# Altium PCB charging_device.PcbDoc (part 1 of 3)
Units mm, origin at the board's own origin, x right, y up, seen from the top; angles counter-clockwise.
Board outline 200.72 x 85.24 mm, 2 copper layers (Top Layer, Bottom Layer); 199 components, 123 nets, 612 pads, 55 vias.
Unrouted connection lines stored in the file: 5.
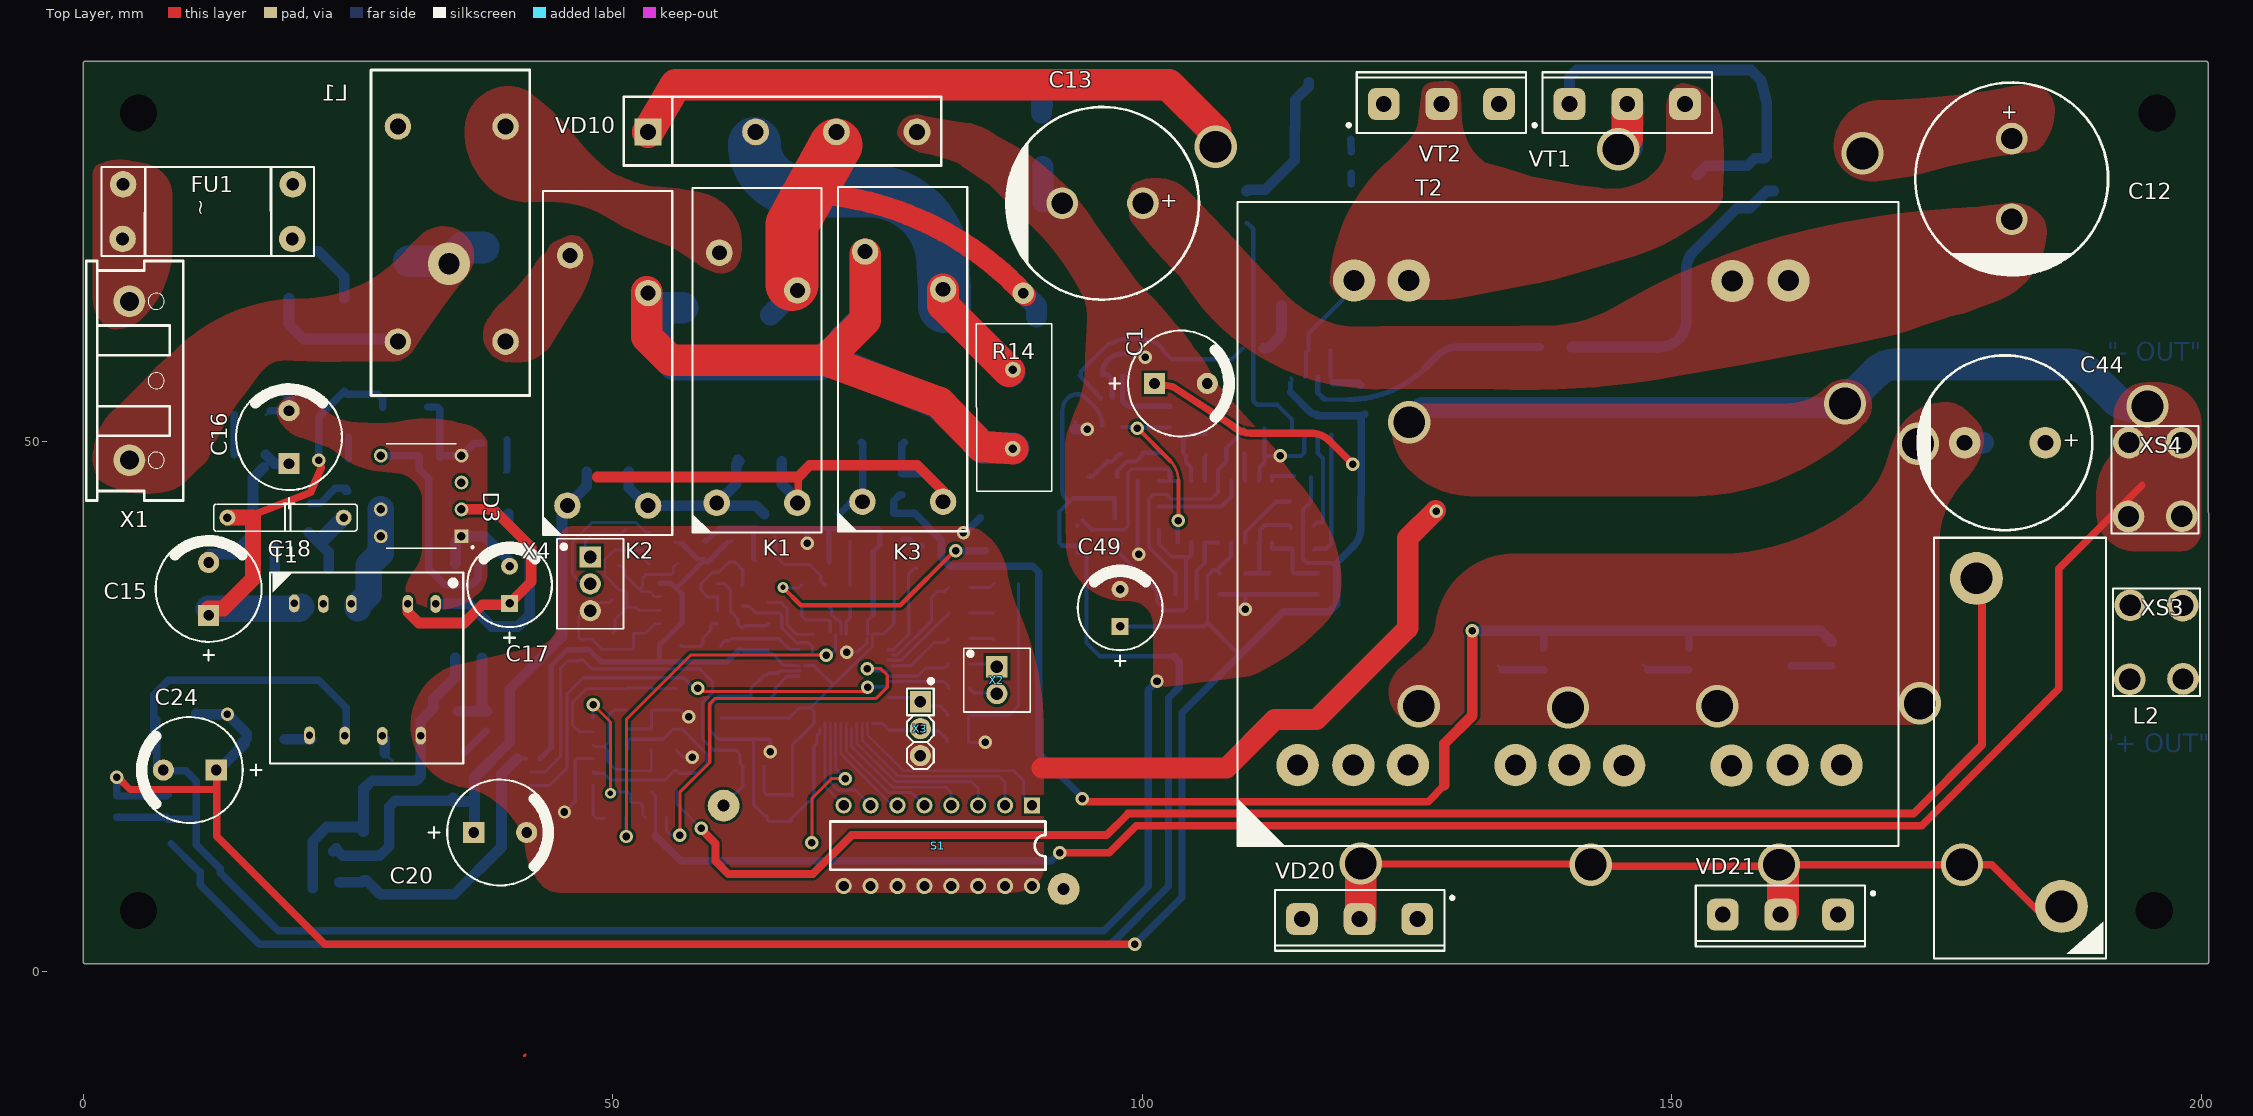
[diagram p0: Top Layer view]
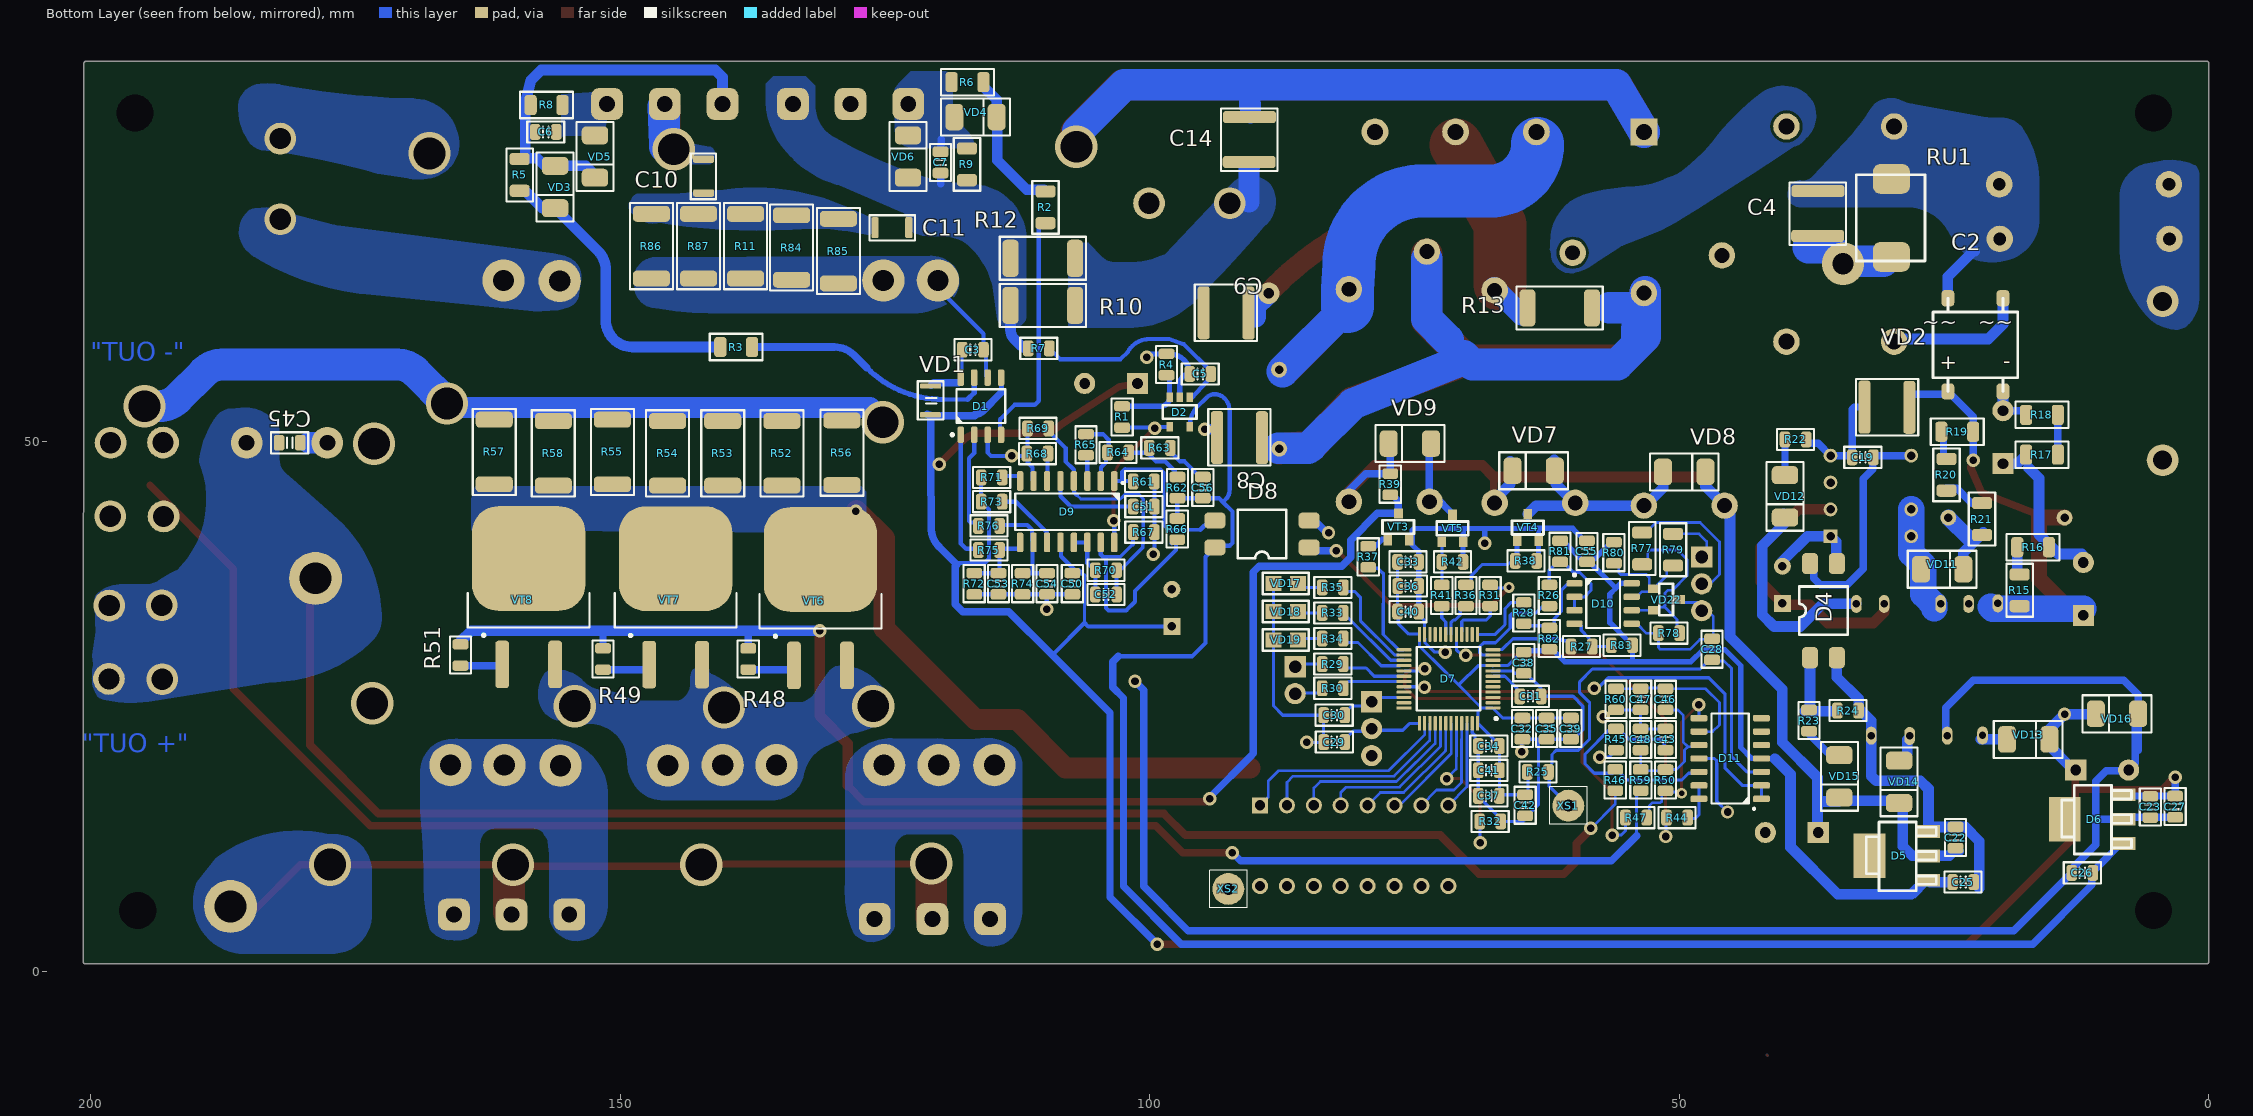
[diagram p1: Bottom Layer view, seen from below]
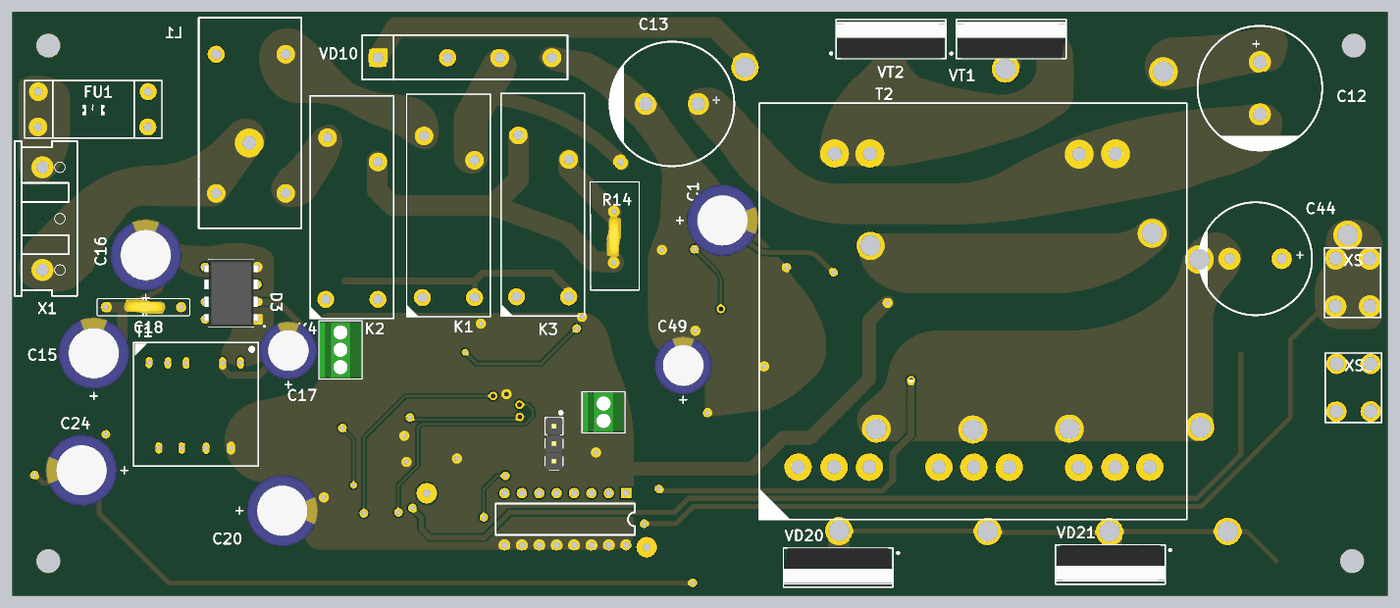
[diagram p4: 3D render of the assembled board from above, using the file's embedded part models]
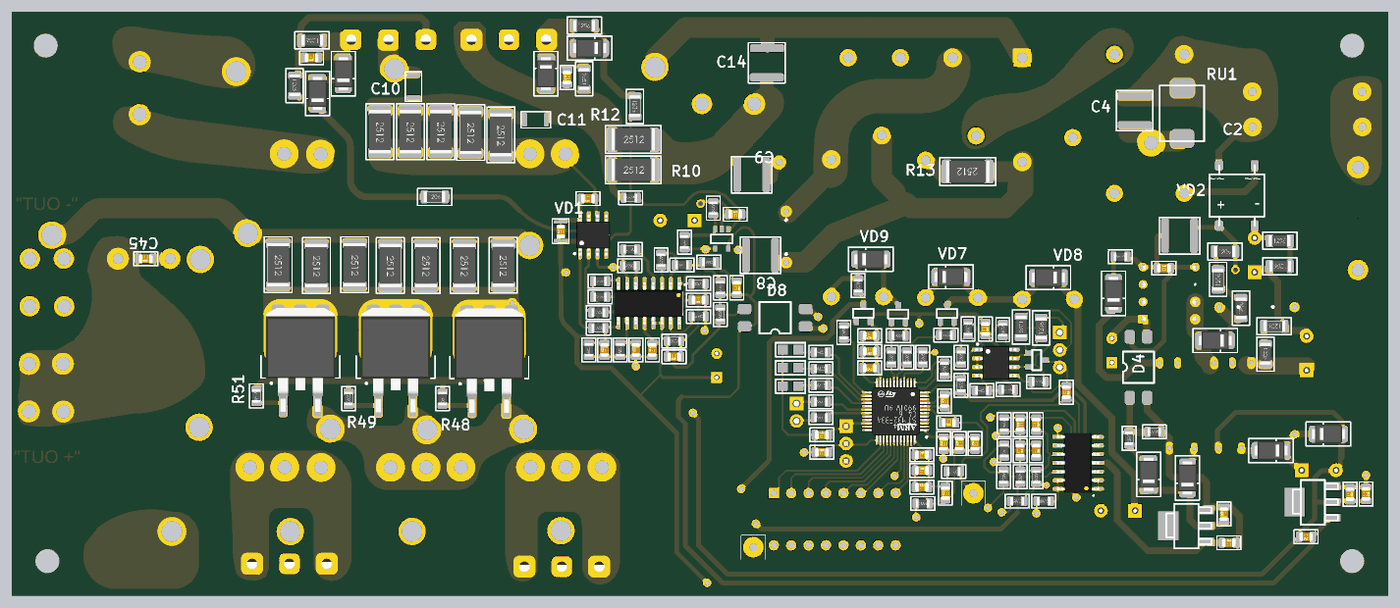
[diagram p5: 3D render of the assembled board from below, using the file's embedded part models]

## Layer stack, top to bottom
Top Solder: solder mask 0.0102, Solder Resist, Dk 3.5
Top Layer: signal copper 0.0356
Dielectric 1: dielectric 0.32, FR-4, Dk 4.8
Bottom Layer: signal copper 0.0356
Bottom Solder: solder mask 0.0102, Solder Resist, Dk 3.5

## Board outline
0.015,0.942 cw(c0.191,1.016) 0,1.016 0,85.725 cw(c0.191,85.725) 0.191,85.916 200.473,85.916 cw(c200.473,85.725) 200.663,85.725 200.725,0.889 cw(c200.534,0.889) 200.725,0.889 cw(c200.534,0.889) 200.724,0.872 cw(c200.533,0.867) 200.724,0.867 cw(c200.533,0.867) 200.533,0.676 0.191,0.676 cw(c0.191,0.867)

## Design rules (kind name [scope] priority, off if disabled: settings)
Clearance [All] p1: gap=0.254 ignorepadtopadclearanceinfootprint=FALSE except(0: Arc-Hole Track-Hole SMDPad-Hole THPad-Hole Via-Hole Fill-Hole Poly-Hole Region-Hole Text-Hole)
PolygonConnect [All] p1: connectstyle=Direct reliefconductorwidth=0.254 reliefentries=4 polygonreliefangle="90 Angle" airgapwidth=0.254
RoutingVias [All] p1: holewidth=0.711 width=1.27 viastyle="Through Hole" minholewidth=0.711 minwidth=1.27 maxholewidth=0.711 maxwidth=1.27
SolderMaskExpansion [All] p1: expansion=0.102
Width [All] p1: maxlimit=0.254 minlimit=0.254 preferedwidth=0.254
30 further rules are at their usual default settings.

## Classes and differential pairs
component class U_RS485: C55 D10 R77 R78 R79 R80 R81 R82 R83 VD22 X4
component class U_PWMcontroller: C49 C50 C51 C52 C53 C54 D8 D9 R61 R62 R63 R64 R65 R66 R67 R68 R69 R70 R71 R72 R73 R74 R75 R76
component class U_OutPut: C43 C44 C45 C46 C47 C48 L2 R44 R45 R46 R47 R48 R49 R50 R51 R52 R53 R54 R55 R56 R57 R58 R59 R60 T2 VD20 VD21 VT6 VT7 VT8 XS3 XS4
component class U_Microcontroller: C28 C29 C30 C31 C32 C33 C34 C35 C36 C37 C38 C39 C40 C41 C42 D7 D11 R25 R26 R27 R28 R29 R30 R31 R32 R33 R34 R35 R36 R37 R38 R39 R41 R42 S1 VD17 VD18 VD19 VT3 VT4 VT5 X2 X3 XS1 XS2
component class U_LowPower: C15 C16 C17 C18 C19 C20 C22 C23 C24 C25 C26 C27 D3 D4 D5 D6 R15 R16 R17 R18 R19 R20 R21 R22 R23 R24 T1 VD11 VD12 VD13 VD14 VD15 VD16
component class U_InPut: C1 C2 C3 C4 C5 C6 C7 C8 C9 C10 C11 C12 C13 C14 C56 D1 D2 FU1 K1 K2 K3 L1 R1 R2 R3 R4 R5 R6 R7 R8 R9 R10 R11 R12 R13 R14 R84 R85 R86 R87 RU1 VD1 VD2 VD3 VD4 VD5 VD6 VD7 VD8 VD9 VD10 VT1 VT2 X1

## Components (designator, comment, footprint, x,y, rotation, side; value= is the part's Value field where it differs from the comment)
C1 "Aluminum Electrolytic Capacitors - 10X12" CAP-D10C5H20 103.661,55.487 r0 top value="470 µF 25 V"
C2 "GA355DR7GF472KW01" "CAP-2220 (5_7x5_0mm)" 30.48,53.213 r0 bottom value="4700 pF, 250VAC"
C3 "Ceramic Capacitor - 1808" CAP-0805 116.712,58.674 r0 bottom value="1 nF, 250 VAC"
C4 "GA355DR7GF472KW01" "CAP-2220 (5_7x5_0mm)" 36.957,71.628 r90 bottom value="4700 pF, 250VAC"
C5 "Ceramic Capacitor -  0805" CAP-0805 95.236,56.388 r180 bottom value="0.1 µF, 50V"
C6 "Ceramic Capacitor  0805" CAP-0805 157.05,79.24 r0 bottom value="100 pF, 50V"
C7 "Ceramic Capacitor  0805" CAP-0805 119.761,76.363 r90 bottom value="100 pF, 50V"
C8 "GA355DR7GF472KW01" "CAP-2220 (5_7x5_0mm)" 91.44,50.419 r180 bottom value="4700 pF, 250 VAC"
C9 "GA355DR7GF472KW01" "CAP-2220 (5_7x5_0mm)" 92.71,62.185 r180 bottom value="4700 pF, 250 VAC"
C10 "Ceramic Capacitor - 1808" CAP-1808(4_5x2_0mm) 142.113,75.045 r90 bottom value="1000 pF, 250VAC"
C11 "Ceramic Capacitor - 1808" CAP-1808(4_5x2_0mm) 124.333,70.231 r0 bottom value="1000 pF, 250VAC"
C12 "Capacitors - EKXG401ELL121MMP1S" CAP_D18X35.5_VER 182.118,78.613 r270 top value="120 µF, 400V"
C13 "Capacitors - EKXG401ELL121MMP1S" CAP_D18X35.5_VER 100.076,72.503 r180 top value="120 µF, 400V"
C14 "GA355DR7GF472KW01" "CAP-2220 (5_7x5_0mm)" 90.642,78.613 r90 bottom value="4700 pF, 250 VAC"
C15 "Electrolytic Capacitor - 400AX15MEFC10X16" CAP-D10C5H20 11.841,36.084 r90 top value="15 µF, 400V"
C16 "Electrolytic Capacitor - 400AX15MEFC10X16" CAP-D10C5H20 19.431,50.419 r90 top value="15 µF, 400V"
C17 "Electrolytic Capacitor - EEU-FC1H150H" CAP-D8C3.5H12 40.259,36.472 r90 top value="15 µF 50 V"
C18 "Mica Capacitor - CDV30FJ222JO3" CAP-Ceramic_P11mm 19.306,42.815 r0 top value="2,2 nF, 2kV"
C19 "Ceramic Capacitor - GRM21BR71H104KA01" CAP-0805 32.669,48.514 r180 bottom value="100 nF"
C20 "Electrolytic Capacitors" CAP-D10C5H20 39.37,13.081 r0 top value="220 µF, 35V"
C22 "Ceramic Capacitor - GRM21BR61E106KA73L" CAP-0805 23.906,12.605 r90 bottom value="10 µF"
C23 "Ceramic Capacitor - GRM21BR61E106KA73L" CAP-0805 5.52,15.494 r270 bottom value="10 µF"
C24 "Electrolytic Capacitors" CAP-D10C5H20 10.063,18.983 r180 top value="470mkF-25V 105C 8x12 Low ESR Changxin"
C25 "Ceramic Capacitor - GRM21BR61E106KA73L" CAP-0805 23.193,8.398 r180 bottom value="10 µF"
C26 "Ceramic Capacitor - GRM21BR61E106KA73L" CAP-0805 11.938,9.271 r0 bottom value="10 µF"
C27 "Ceramic Capacitor - GRM21BR61E106KA73L" CAP-0805 3.175,15.526 r270 bottom value="10 µF"
C28 "Ceramic Capacitor- GRM21BR71H104KA01" CAP-0805 46.905,30.386 r270 bottom value="0.1 µF"
C29 "Ceramic Capacitor -GRM2165C1H270JZ01D" CAP-0805 82.576,21.623 r180 bottom value="27 pF"
C30 "Ceramic Capacitor -GRM2165C1H270JZ01D" CAP-0805 82.592,24.163 r180 bottom value="27 pF"
C31 "Ceramic Capacitor- GRM21BR71H104KA01" CAP-0805 64.05,25.941 r0 bottom value="100 nF"
C32 "Ceramic Capacitor  - GRM219C71E475KE21L" CAP-0805 64.812,22.893 r90 bottom value="4.7 µF"
C33 "Ceramic Capacitor  - GRM219C71E475KE21L" CAP-0805 75.607,38.641 r0 bottom value="4.7 µF"
C34 "Ceramic Capacitor  - GRM219C71E475KE21L" CAP-0805 67.987,21.242 r180 bottom value="4.7 µF"
C35 "Ceramic Capacitor- GRM21BR71H104KA01" CAP-0805 62.526,22.893 r90 bottom value="100 nF"
C36 "Ceramic Capacitor- GRM21BR71H104KA01" CAP-0805 75.591,36.355 r0 bottom value="100 nF"
C37 "Ceramic Capacitor- GRM21BR71H104KA01" CAP-0805 67.987,16.543 r180 bottom value="100 nF"
C38 "CC0805" CAP-0805 64.685,29.116 r90 bottom value="1.0 µF"
C39 "Ceramic Capacitor- GRM21BR71H104KA01" CAP-0805 60.24,22.893 r90 bottom value="100 nF"
C40 "Ceramic Capacitor- GRM21BR71H104KA01" CAP-0805 75.607,33.942 r0 bottom value="100 nF"
C41 "Ceramic Capacitor- GRM21BR71H104KA01" CAP-0805 67.987,18.956 r180 bottom value="100 nF"
C42 "CC0805" CAP-0805 64.558,15.654 r90 bottom value="10 nF"
C43 "Ceramic Capacitor - GRM2195C1H103JA01D" CAP-0805 51.303,21.868 r270 bottom value="10 nF"
C44 "Capacitor - EKYC500ELL202ML30S" CAP_D16X26_VER 185.293,49.886 r180 top value="2000 µF"
C45 "Capacitor - CL21B104KCFNNNE" CAP-0805 181.229,49.886 r0 bottom value="100 nF"
C46 "Ceramic Capacitor - GRM2195C1H103JA01D" CAP-0805 51.303,25.659 r270 bottom value="100 nF"
C47 "Ceramic Capacitor - GRM2195C1H103JA01D" CAP-0805 53.652,25.659 r90 bottom value="100 nF"
C48 "Ceramic Capacitor - GRM2195C1H103JA01D" CAP-0805 53.652,21.868 r270 bottom value="100 nF"
C49 "Electrolytic Capacitors" CAP-D8C3.5H12 97.917,34.29 r90 top value="220 µF"
C50 "Ceramic Capacitor - 0805" CAP-0805 107.315,36.576 r90 bottom value="0.01 µF"
C51 "Ceramic Capacitor   CC0805KRX7R9BB103" CAP-0805 100.569,43.858 r0 bottom value="10 nF"
C52 "Ceramic Capacitor  0805" CAP-0805 104.14,35.56 r0 bottom value="2.2 µF"
C53 "Capacitor GRM2165C1H102JA01D" CAP-0805 114.3,36.576 r90 bottom value="1 nF"
C54 "Capacitor GRM2165C1H102JA01D" CAP-0805 109.71,36.576 r90 bottom value="1 nF"
C55 "CC0805" CAP-0805 58.716,39.632 r270 bottom value=GRM21BR71H104KA01
C56 "Ceramic Capacitor -  0805" CAP-0805 94.996,45.656 r270 bottom value="0.1 µF, 50V"
D1 "Driver IRS2186S" 8-SOIC 115.951,53.34 r90 bottom value="600V; Iout+: 4 А"
D2 "Amplifire LMV321ilt" SOT-23-5 96.233,54.18 r0 bottom value="1.3 MHz"
D3 "PWM controller VIPER16L" DIP762W46P254L988H533Q8 31.907,44.863 r180 top value=Viper16ln
D4 "Photocoupler PC817X3NIP1B" PC123PJ(SMT) 37.656,29.591 r90 bottom value=PC817
D5 "Linear Voltage Regulator LM1117" SOT-223_LD1117_SOT223(Primary) 26.134,8.581 r90 bottom value=3.3V
D6 "Linear Voltage Regulator L78L33C" SOT-223 7.689,12.051 r90 bottom value=3.3V
D7 "Microcontroller  STM32F030C8T6" 48-LQFP 71.797,27.592 r0 bottom value=STM32F030C8T6
D8 "Photocoupler" PC123PJ(SMT) 84.963,40.005 r0 bottom value=PC817
D9 "PWM controller TL494BD" 16-SO 107.808,43.35 r270 bottom value=TL494
D10 "Transceivers SN65HVD10dr" 8-SOIC 57.192,34.704 r180 bottom value=RS485/UART
D11 "Amplifier - LMV324" 14-SOIC 45.191,20.071 r0 bottom value="1 MHz"
FU1 "FUSE_VER" FUSE-5x20 11.811,71.628 r0 top value="16A, 250VAC"
K1 "Purpose Relay  - ALE15B05" Relay_ALE12 59.563,44.212 r90 top value="5VDC, 16 A, 277VAC - Max"
K2 "Purpose Relay  - ALE15B05" Relay_ALE12 45.466,43.958 r90 top value="5VDC, 16 A, 277VAC - Max"
K3 "Purpose Relay  - ALE15B05" Relay_ALE12 73.324,44.323 r90 top value="5VDC, 16 A, 277VAC - Max"
L1 "8108-RC" FILTER_PWR 35.052,69.596 r270 top value="10A, 1 mH @ 1 kHz"
L2 "CDRH" L_50A_INDUCTOR 510.261,243.129 r90 top
R1 "Resistor 0805" RES-0805 102.616,52.324 r270 bottom value=CR0805-FX-1502ELF
R2 "Resistor 1206" RES-1206 109.855,72.125 r270 bottom value="5.1 Om"
R3 "Resistor 1206" RES-1206 139.065,58.928 r180 bottom value="5.1 Om"
R4 "Resistor 0805" RES-0805 98.425,57.277 r270 bottom value="150 Om"
R5 "Resistor 1206" RES-1206 159.512,75.184 r270 bottom value="5.1 Om"
R6 "Resistor 1206" RES-1206 117.221,83.947 r180 bottom value="5.1 Om"
R7 "Resistor 0805" RES-0805 110.49,58.801 r180 bottom value="150 Om"
R8 "Resistor 1206" RES-1206 156.972,81.788 r0 bottom value="10 kOm"
R9 "Resistor 1206" RES-1206 117.267,76.184 r90 bottom value="10 kOm"
R10 "R2512" RES-2512 110.109,62.865 r180 bottom value="10 mOm"
R11 "Resistor 2512" RES-2512 138.176,68.453 r270 bottom value="270 Om"
R12 "R2512" RES-2512 110.109,67.31 r180 bottom value="10 mOm"
R13 "Resistor 2512" RES-2512 61.293,62.627 r0 bottom value="1 MOm"
R14 "Inrush Current Limiter - B57237-S" RES_LIM-15_7_7.5 87.846,53.086 r90 top value=9A
R15 "Resistor 1206" RES-1206 17.859,35.957 r270 bottom value="1 Mom"
R16 "Resistor 1206" RES-1206 16.589,40.025 r0 bottom value="1 Mom"
R17 "Resistor 1206" RES-1206 15.748,48.768 r0 bottom value="1 Mom"
R18 "Resistor 1206" RES-1206 15.748,52.527 r180 bottom value="1 Mom"
R19 "Resistor 1206" RES-1206 23.749,50.927 r180 bottom value="33,2 kOm"
R20 "Resistor 1206" RES-1206 24.765,46.863 r90 bottom value="33,2 kOm"
R21 "Resistor 1206" RES-1206 21.415,42.688 r90 bottom value="33,2 kOm"
R22 "Resistor 0805" RES-0805 39.019,50.197 r180 bottom value="33,2 kOm"
R23 "Resistor 0805" RES-0805 37.749,23.654 r90 bottom value="240 om"
R24 "Resistor 0805" RES-0805 34.066,24.596 r180 bottom value="1 kOm"
R25 "0805WAJ0153T10" RES-0805 63.352,18.801 r0 bottom value="15 kOm"
R26 "Resistor 0805" RES-0805 62.272,35.466 r90 bottom value="510 Om"
R27 "Resistor 0805" RES-0805 59.224,30.64 r180 bottom value="510 Om"
R28 "Resistor 0805" RES-0805 64.685,33.815 r270 bottom value="510 Om"
R29 "Resistor 0805" RES-0805 82.719,28.989 r0 bottom value="510 Om"
R30 "Resistor 0805" RES-0805 82.719,26.703 r0 bottom value="510 Om"
R31 "Resistor 0805" RES-0805 67.86,35.466 r90 bottom value="510 Om"
R32 "Resistor 0805" RES-0805 67.86,14.13 r180 bottom value="10 kOm"
R33 "Resistor 0805" RES-0805 82.719,33.815 r180 bottom value="510 Om"
R34 "Resistor 0805" RES-0805 82.719,31.402 r180 bottom value="510 Om"
R35 "Resistor 0805" RES-0805 82.719,36.228 r180 bottom value="510 Om"
R36 "Resistor 0805" RES-0805 70.146,35.466 r270 bottom value="510 Om"
R37 "Resistor 0805" RES-0805 79.375,39.116 r90 bottom value="510 Om"
R38 "Resistor 0805" RES-0805 64.479,38.735 r180 bottom value="510 Om"
R39 "Resistor 0805" RES-0805 77.295,45.974 r270 bottom value="510 Om"
R41 "Resistor 0805" RES-0805 72.432,35.466 r270 bottom value="510 Om"
R42 "Resistor 0805" RES-0805 71.416,38.641 r180 bottom value="510 Om"
R44 "Resistor 0805" RES-0805 50.207,14.483 r0 bottom value="27 kOm"
R45 "Resistor 0805" RES-0805 55.986,21.865 r90 bottom value="2 kOm"
R46 "0805WAF2702T10" RES-0805 56.049,18.039 r270 bottom value="27 kOm"
R47 "Resistor 0805" RES-0805 54.081,14.483 r0 bottom value="100 Om"
R48 "Resistor 0805" RES-0805 137.922,29.464 r90 bottom value="100 Om"
R49 "Resistor 0805" RES-0805 151.638,29.464 r90 bottom value="100 Om"
R50 "Resistor 0805" RES-0805 51.308,18.031 r270 bottom value="24 kOm"
R51 "Resistor 0805" RES-0805 165.1,29.845 r90 bottom value="100 Om"
R52 "Resistor 2512" RES-2512 134.747,48.895 r270 bottom value="10 mOm"
R53 "Resistor 2512" RES-2512 140.335,48.895 r270 bottom value="10 mOm"
R54 "Resistor 2512" RES-2512 145.542,48.895 r270 bottom value="10 mOm"
R55 "Resistor 2512" RES-2512 150.749,49.022 r270 bottom value="10 mOm"
R56 "Resistor 2512" RES-2512 129.076,48.947 r270 bottom value="10 mOm"
R57 "Resistor 2512" RES-2512 161.913,49.022 r270 bottom value="10 mOm"
R58 "Resistor 2512" RES-2512 156.337,48.895 r270 bottom value="10 mOm"
R59 "Resistor 0805" RES-0805 53.636,18.039 r90 bottom value="100 Om"
R60 "Resistor 0805" RES-0805 55.986,25.659 r90 bottom value="100 Om"
R61 "Resistor 0805" RES-0805 100.584,46.228 r0 bottom value="5 kOm"
R62 "Resistor 0805" RES-0805 97.396,45.656 r270 bottom value="5 kOm"
R63 "Resistor 0805" RES-0805 99.06,49.403 r0 bottom value="5 kOm"
R64 "Resistor 0805" RES-0805 102.997,48.969 r180 bottom value="510 Om"
R65 "Resistor 0805" RES-0805 106.03,49.7 r90 bottom value="51 kOm"
R66 "Resistor 0805" RES-0805 97.409,41.736 r90 bottom value="1 kOm"
R67 "Resistor 0805" RES-0805 100.569,41.445 r0 bottom value="1 kOm"
R68 "0805WAJ0102T10" RES-0805 110.617,48.86 r0 bottom value="1 kOm"
R69 "Resistor 0805" RES-0805 110.554,51.244 r0 bottom value="1 kOm"
R70 "0805S8J0102T5E" RES-0805 104.14,37.846 r180 bottom value="1 kOm"
R71 "0805WAJ0101T10" RES-0805 114.935,46.609 r0 bottom value="100 Om"
R72 "0805WAJ0101T10" RES-0805 116.586,36.576 r90 bottom value="100 Om"
R73 "0805WAJ0101T10" RES-0805 114.935,44.323 r0 bottom value="100 Om"
R74 "0805WAJ0101T10" RES-0805 112.014,36.576 r90 bottom value="100 om"
R75 "Resistor 0805" RES-0805 115.189,39.751 r180 bottom value="10 Om"
R76 "Resistor 0805" RES-0805 115.189,42.037 r180 bottom value="10 Om"
R77 "Resistor 1206" RES-1206 53.509,39.911 r270 bottom value="20 Om"
R78 "Resoistor 0805" RES-0805 50.969,31.91 r180 bottom value="10 kOm"
R79 "Resistor 1206" RES-1206 50.588,39.784 r90 bottom value="20 Om"
R80 "Resoistor 0805" RES-0805 56.176,39.505 r90 bottom value="10 kOm"
R81 "Resistor 0805" RES-0805 61.256,39.641 r270 bottom value="10 kOm"
R82 "Resistor 0805" RES-0805 62.272,31.402 r90 bottom value="10 kOm"
R83 "Resistor 0805" RES-0805 55.414,30.767 r0 bottom value="10 kOm"
R84 "Resistor 2512" RES-2512 133.83,68.326 r270 bottom value="270 Om"
R85 "Resistor 2512" RES-2512 129.413,67.987 r270 bottom value="270 Om"
R86 "Resistor 2512" RES-2512 147.066,68.453 r270 bottom value="270 Om"
R87 "Resistor 2512" RES-2512 142.621,68.453 r270 bottom value="270 Om"
RU1 "Varistor  - B72650M0271K072" CU3225 29.972,67.437 r90 bottom value=CU3225K275G2
S1 "SMD_Switcher" DIP16 89.593,15.648 r270 top value=8pin
T1 "Transformator" TRANSFORMER_PCB_74014_MYRRA 26.772,28.423 r270 top value=74014_MYRRA
T2 "transformator - ETD_54_28_19" "TRANSFORMER_CASE_BH_ETD_54_28_19 - duplicate" 140.564,42.429 r90 top value=5580nH
VD1 "RF Diode 03x02" CAP-3x2mm 120.65,53.848 r90 bottom value="400V, 11.5 W"
VD2 "BRIDGE RECT - DF06S" DFXXS 19.431,63.537 r0 bottom value="600 V"
VD3 "Diode - SOD-123" DIODE-SMA 156.163,74.041 r270 bottom value="40V, 1A"
VD4 "Diode - SOD-123" DIODE-SMA 116.464,80.645 r180 bottom value="40V, 1A"
VD5 "Zener Diode  - SOD-123F" DIODE-SMA 152.4,76.917 r270 bottom value="20 V"
VD6 "Zener Diode  - SOD-123F" DIODE-SMA 122.838,76.917 r90 bottom value="20 V"
VD7 "Diode - S1M" DIODE-SMA 63.754,47.244 r0 bottom
VD8 "Diode - S1M" DIODE-SMA 49.53,47.133 r180 bottom
VD9 "Diode - S1M" DIODE-SMA 75.438,49.816 r0 bottom
VD10 "Bridge Rectifier - GBJ3510" 4GBXXX 60.96,79.248 r0 top value="1 kV, 35 A"
VD11 "DIODE SCHOTTKY - SS110" DIODE-SMA 25.176,37.942 r180 bottom value="100V 1A"
VD12 "DIODE SCHOTTKY - SS110" DIODE-SMA 40.019,44.831 r270 bottom value="100V, 1 A"
VD13 "DIODE SCHOTTKY - SS110" DIODE-SMA 17.048,21.876 r180 bottom value="100V, 1 A"
VD14 "DIODE SCHOTTKY - SS110" DIODE-SMA 29.24,17.864 r270 bottom value="100V, 1 A"
VD15 "Zener Diode - BZV55-C4V3" DIODE-SMA 34.885,18.381 r270 bottom value="4.3 V"
VD16 "Clamp diode  - SMAJ15A" DIODE-SMA 8.666,24.289 r0 bottom value=24.4V
VD17 "LED 0805" RC0805 86.021,36.609 r0 bottom value=red
VD18 "LED 0805" RC0805 86.021,33.942 r0 bottom
VD19 "LED 0805" RC0805 86.021,31.275 r0 bottom
VD20 "Diode Array - MUR3020WTPBF" TO247 120.534,4.913 r180 top value="200V, 15A"
VD21 "Diode Array - MUR3020WTPBF" TO247 160.274,5.331 r180 top value="200V, 15A"
VD22 "Diode Surface - CDSOT23-SM712" SOT-23A 52.493,36.101 r270 bottom value=CDSOT23-SM712
VT1 "Transistor - C3M0280090" TO247 145.81,81.879 r0 top value="900V, 111.5A"
VT2 "Transistor - C3M0280090D" TO247 128.26,81.879 r0 top value="900V, 111.5A"
VT3 "transistor -  IRLML2803" SOT-23A 77.538,40.673 r180 bottom value="30 V, 1.2A"
VT4 "Transistor  IRLML2803" SOT-23A 65.32,40.622 r180 bottom value="30 V, 1.2A"
VT5 "Transistor  IRLML2803" SOT-23A 72.432,40.546 r180 bottom value="30 V, 1.2A"
VT6 "Transistor - IRFS3607PBF-ND" D2PAK 131.108,27.362 r90 bottom value="75V, 80A"
VT7 "Transistor - IRFS3607PBF-ND" D2PAK 144.78,27.437 r90 bottom value="75V, 80A"
VT8 "Transistor - IRFS3607PBF-ND" D2PAK 158.663,27.456 r90 bottom value="75V, 80A"
X1 "2EDGRC-7.5-03P-14-00A(H)" DG300-7.5-03P 4.355,55.746 r270 top value="400V, 20A"
X2 "Terminal Block - 15EDGRC-2.5-02P-14-00L(H)" CON-DG308-2.54-02P 86.275,27.465 r270 top value="250 V, 8A"
X3 "PLS-3" CON-PLS-3 79.052,22.887 r270 top value=PLS3
X4 "Degson Electronics  - DG308-2.54-03P" CON-DG308-2.54-03P 47.879,36.567 r270 top value="130V, 8A"
XS1 "CON1LEP" CON1LEP 60.469,15.626 r270 bottom
XS2 "CON1LEP" CON1LEP 92.583,7.747 r270 bottom
XS3 "CON1LEP" PCB_11_M4 195.834,30.988 r0 top value="Латунь, залужений, під винт M4, прямий"
XS4 "CON1LEP" PCB_11_M4 195.707,46.355 r0 top

## Footprints (in the part's own frame and the unit in brackets; to place one, negate y for a bottom-side part, rotate by r counter-clockwise, add the part's x,y. Pads: shape width x height; smd on the part's side, far side on the other; paste and mask are expansions set on the pad)
4GBXXX [mm]
  rect 2.54x2.54 hole 1.5: 1(-7.62,0)
  round 2.54 hole 1.5: 2(2.54,0) 3(10.16,0) 4(17.78,0)
  silkscreen extent -9.91,-3.17 20.07,3.3
8-SOIC [mm] "pitch 1.27 mm"
  rrect50% 1.55x0.6 smd paste-0.1: 1(-2.7,1.905) 2(-2.7,0.635) 3(-2.7,-0.635) 4(-2.7,-1.905) 5(2.7,-1.905) 6(2.7,-0.635) 7(2.7,0.635) 8(2.7,1.905)
  silkscreen extent -2.82,-2.3 1.61,2.83, body extent -3,-2.45 3,2.45, height 1.75
14-SOIC [mm] "pitch 1.27 mm"
  rrect50% 1.6x0.6 smd paste-0.1: 1(-2.95,3.81) 2(-2.95,2.54) 3(-2.95,1.27) 4(-2.95,0) 5(-2.95,-1.27) 6(-2.95,-2.54) 7(-2.95,-3.81) 8(2.95,-3.81) 9(2.95,-2.54) 10(2.95,-1.27) 11(2.95,0) 12(2.95,1.27) 13(2.95,2.54) 14(2.95,3.81)
  silkscreen extent -2.35,-4.25 1.75,4.85, body extent -3.07,-4.34 3.07,4.36, height 1.78
16-SO [mm] "pitch 1.27 mm"
  rrect50% 1.85x0.6 smd paste-0.1: 1(-2.925,4.448) 2(-2.925,3.178) 3(-2.925,1.908) 4(-2.925,0.638) 5(-2.925,-0.632) 6(-2.925,-1.902) 7(-2.925,-3.172) 8(-2.925,-4.442) 9(2.875,-4.442) 10(2.875,-3.172) 11(2.875,-1.902) 12(2.875,-0.632) 13(2.875,0.638) 14(2.875,1.908) 15(2.875,3.178) 16(2.875,4.448)
  silkscreen extent -2.85,-4.9 1.7,5.35, body extent -3.09,-5.01 3.04,4.96, height 1.73
48-LQFP [mm] "QFP, 48-Leads, Body 7x7mm, Pitch 0.5mm, IPC Medium Density"
  rrect50% 1.4x0.3 smd paste-0.05: 1(-4.2,2.75) 2(-4.2,2.25) 3(-4.2,1.75) 4(-4.2,1.25) 5(-4.2,0.75) 6(-4.2,0.25) 7(-4.2,-0.25) 8(-4.2,-0.75) 9(-4.2,-1.25) 10(-4.2,-1.75) 11(-4.2,-2.25) 12(-4.2,-2.75) 25(4.2,-2.75) 26(4.2,-2.25) 27(4.2,-1.75) 28(4.2,-1.25) 29(4.2,-0.75) 30(4.2,-0.25) 31(4.2,0.25) 32(4.2,0.75) 33(4.2,1.25) 34(4.2,1.75) 35(4.2,2.25) 36(4.2,2.75)
  rrect50% 0.3x1.4 smd paste-0.05: 13(-2.75,-4.2) 14(-2.25,-4.2) 15(-1.75,-4.2) 16(-1.25,-4.2) 17(-0.75,-4.2) 18(-0.25,-4.2) 19(0.25,-4.2) 20(0.75,-4.2) 21(1.25,-4.2) 22(1.75,-4.2) 23(2.25,-4.2) 24(2.75,-4.2) 37(2.75,4.2) 38(2.25,4.2) 39(1.75,4.2) 40(1.25,4.2) 41(0.75,4.2) 42(0.25,4.2) 43(-0.25,4.2) 44(-0.75,4.2) 45(-1.25,4.2) 46(-1.75,4.2) 47(-2.25,4.2) 48(-2.75,4.2)
  silkscreen extent -4.62,-3 3,3.87, body extent -4.5,-4.5 4.5,4.5, height 1.6
CAP-3x2mm [mm]
  rrect50% 0.5x2 smd: 1(-1.321,0.076) 2(1.397,0.051)
  silkscreen extent -1.75,-1.17 1.85,1.27, body extent -1,-0.62 1,0.63, height 0.78
CAP-0805 [mm]
  rrect50% 1x1.5 smd: 1(-1,0) 2(1,0)
  silkscreen extent -1.75,-1 1.75,1, body extent -1,-0.62 1,0.63, height 0.78
CAP-1808(4_5x2_0mm) [mm]
  rrect50% 0.7x2 smd: 1(-1.575,0.025) 2(1.626,0.025)
  silkscreen extent -2.16,-1.14 2.16,1.24, body extent -0.51,-0.33 -0.25,-0.13, height 0.25
"CAP-2220 (5_7x5_0mm)" [mm]
  rrect50% 1.15x5 smd: 1(-2.21,-0.025) 2(2.032,-0.051)
  silkscreen extent -3.05,-2.69 2.84,2.64, body extent -0.51,-0.18 -0.25,0.03, height 0.25
CAP-Ceramic_P11mm [mm]
  round 1.5 hole 0.8: 1(-5.69,0) 2(5.283,0)
  silkscreen extent -6.99,-1.27 6.55,1.27, body extent -3.03,-1 2.97,1.1, height 8.1
CAP-D8C3.5H12 [mm]
  rect 1.6x1.6 hole 0.8: 1(-1.75,0)
  round 1.6 hole 0.8: 2(1.75,0)
  silkscreen extent -5.5,-4 4,4, body extent -4.25,-4.25 4.25,4.25, height 13
CAP-D10C5H20 [mm]
  rect 2x2 hole 1: 1(-2.5,0)
  round 2 hole 1: 2(2.5,0)
  silkscreen extent -6.75,-5 5,5, body extent -5.25,-5.25 5.25,5.25, height 22.1
CAP_D16X26_VER [mm]
  round 3 hole 1.5: 1(0,0) 2(7.62,0)
  silkscreen extent -4.44,-8.25 12.06,8.25
CAP_D18X35.5_VER [mm]
  round 3 hole 2: 1(0,0) 2(7.62,0)
  silkscreen extent -5.29,-9.1 12.95,9.1
CON1LEP [mm]
  round 3 hole 1.118: 1(0,0)
  silkscreen extent -1.78,-1.78 1.78,1.78
CON-DG308-2.54-02P [mm]
  rect 2x2 hole 1.2: 1(-1.27,0)
  round 2 hole 1.2: 2(1.27,0)
  silkscreen extent -3,-3.14 3,3.14, body extent -2.9,-3 2.9,3.02, height 8.33
CON-DG308-2.54-03P [mm]
  rect 2x2 hole 1.2: 1(-2.54,0)
  round 2 hole 1.2: 2(0,0) 3(2.54,0)
  silkscreen extent -4.25,-3.14 4.25,3.14, body extent -4,-3 4,3.02, height 8.33
CON-PLS-3 [mm]
  rect 2x2 hole 1.1: 1(-2.54,0)
  round 2 hole 1.1: 2(0,0) 3(2.54,0)
  silkscreen extent -4.7,-1.27 3.81,1.27, body extent -3.81,-1.27 3.81,1.27, height 8.54
CU3225 [mm]
  rrect50% 2.8x3.5 smd: 1(0,0) 2(7.366,0)
  silkscreen extent -0.38,-3.18 7.75,3.3
D2PAK [mm]
  rrect50% 4.5x1.3 smd paste-0.1: 1(1.5,2.5) 3(1.5,-2.5)
  rrect50% 2x2 smd: 2(8.25,0) 2(8.25,-3.25) 2(8.25,3.25) 2(11.5,0) 2(11.5,-3.25) 2(11.5,3.25) 2(14.75,-3.25) 2(14.75,0) 2(14.75,3.25)
  rrect50% 9.9x10.7 smd paste-10: 2(11.5,0)
  round 0.5 on Mech6: ""(0.5,4.5)
  silkscreen extent 4.13,-5.75 8.25,5.75, body extent 0,-5.08 15.26,5.08, height 4.98
DFXXS [mm]
  rrect50% 1.2x1.52 smd: 1(0,0) 2(5.2,0) 3(5.2,8.8) 4(0,8.8)
  silkscreen extent -1.4,0 6.6,8.8
DG300-7.5-03P [mm]
  round 3 hole 1.8: 1(-7.5,0) 3(7.5,0)
  round 0 all layers, no hole: 2(0,0)
  silkscreen extent -11.3,-4.06 11.3,5.08
DIODE-SMA [mm]
  rrect50% 1.7x2.5 smd: 1(-2,0) 2(2,0)
  round 0.5 on Mech6: ""(2,0.9)
  silkscreen extent -3.25,-1.75 3.25,1.75, body extent -2.5,-1.35 2.5,1.35, height 2.28
DIP16 [mil]
  rect 60x60 hole 38: 1(0,0)
  round 60 hole 38: 2(0,-100) 3(0,-200) 4(0,-300) 5(0,-400) 6(0,-500) 7(0,-600) 8(0,-700) 9(300,-700) 10(300,-600) 11(300,-500) 12(300,-400) 13(300,-300) 14(300,-200) 15(300,-100) 16(300,0)
  silkscreen extent 60,-750 240,50
DIP762W46P254L988H533Q8 [mm]
  rect 1.308x1.308 / inner round 1.308 / far side rect 1.308x1.308 hole 0.8: 1(-3.81,3.81)
  round 1.308 hole 0.8: 2(-3.81,1.27) 3(-3.81,-1.27) 4(-3.81,-3.81) 5(3.81,-3.81) 7(3.81,1.27) 8(3.81,3.81)
  round 0 all layers, no hole: 6(3.81,-1.27)
  silkscreen extent -4.95,-4.94 3.3,4.95, body extent -3.96,-4.94 3.96,4.94, height 5.33
FILTER_PWR [mm]
  round 2.5 hole 1.5: 1(-10.16,-5.334) 2(-10.16,4.826) 3(10.16,4.826) 4(10.16,-5.334)
  silkscreen extent -15.49,-7.87 15.24,7.11
FUSE-5x20 [mm]
  round 2.5 hole 1.2: 1(-8.103,-2.489) 1(-8.052,2.667) 2(7.925,-2.489) 2(7.976,2.667)
  silkscreen extent -10.08,-4.09 9.98,4.29, body extent -1.6,-0.79 1.6,0.79, height 0.7
L_50A_INDUCTOR [mm]
  round 5 hole 3: 1(-237.033,323.444) 2(-206.045,331.47)
  silkscreen extent -241.94,319.25 -202.21,335.48
PC123PJ(SMT) [mm]
  rrect50% 2x1.5 smd: 1(0,0) 2(0,-2.54) 3(8.89,-2.54) 4(8.89,0)
  silkscreen extent 2.16,-3.56 6.73,1.02
PCB_11_M4 [mm] "pitch 1.27 mm"
  round 3 hole 2: 1(-2.565,-3.429) 1(-2.515,3.556) 1(2.438,3.531) 1(2.464,-3.404)
  silkscreen extent -4.17,-5.03 4.06,5.13
RC0805 [mil]
  rect 60x56 smd: 1(0,0) 2(90,0)
  silkscreen extent -40,-40 130,40
Relay_ALE12 [mm]
  round 2.5 hole 1.4: 1(0,-0.254) 2(23.622,-0.508) 3(20.066,-7.874) 4(0,-7.874)
  silkscreen extent -2.79,-10.16 29.72,2.03
RES-0805 [mm]
  rrect50% 1x1.5 smd: 1(-1,0) 2(1,0)
  silkscreen extent -1.75,-1 1.75,1, body extent -1,-0.6 1,0.6, height 0.44
RES-1206 [mm]
  rrect50% 1.15x1.9 smd: 1(-1.5,0) 2(1.5,0)
  silkscreen extent -2.5,-1.25 2.5,1.25, body extent -1.65,-0.8 1.55,0.8, height 0.47
RES-2512 [mm]
  rrect50% 1.5x3.5 smd: 1(-3.05,0) 2(3.05,0)
  silkscreen extent -4.06,-2.03 4.06,2.03, body extent -3.17,-1.6 3.18,1.6, height 0.52
RES_LIM-15_7_7.5 [mm]
  round 1.5 hole 0.8: 1(-3.759,0.076) 2(3.708,0.051)
  silkscreen extent -7.77,-3.61 8.05,3.51, body extent -3.03,-1 2.97,1.1, height 8.1
SOT-23-5 [mm]
  rect 0.6x0.9 smd: 1(0,0) 2(0.95,0) 3(1.9,0) 4(1.9,2.8) 5(0,2.8)
  silkscreen extent -0.64,0.76 2.54,2.03
SOT-23A [mil]
  rect 32x38 smd: 1(0,0) 2(80,0) 3(40,100)
  silkscreen extent -19,24 98,75
SOT-223 [mm]
  rect 1.2x2.2 smd: 1(-0.01,0.33) 2(2.29,0.33) 3(4.59,0.33)
  rect 4.2x3 smd: 4(2.3,5.9)
  silkscreen extent -1,-0.4 5.5,6.2
SOT-223_LD1117_SOT223(Primary) [mm]
  rect 1.2x2.2 smd: 1(4.59,0.33) 2(-0.01,0.33) 3(2.29,0.33)
  rect 4.2x3 smd: 4(2.3,5.9)
  silkscreen extent -1,-0.4 5.5,6.2
TO247 [mm] "3-Lead Plastic TO-247"
  rrect50% 3x3 hole 1.5: 1(-5.45,0) 2(0,0) 3(5.45,0)
  round 0.5 on Mech4: ""(-7.4,-2.3)
  silkscreen extent -8.9,-2.75 8,3, body extent -7.95,-2.75 7.95,2.35, height 26.95
"TRANSFORMER_CASE_BH_ETD_54_28_19 - duplicate" [mm] "pitch 1.27 mm"
  round 4 hole 2: 1(-22.987,25.883) 2(-22.987,20.625) 3(-22.987,15.469) 5(-22.987,5.309) 6(-22.987,0.229) 7(-23.012,-4.953) 9(-23.038,-15.088) 10(-22.987,-20.396) 11(-22.987,-25.476) 13(22.784,-20.472) 14(22.733,-15.164) 20(22.784,15.392) 21(22.784,20.549)
  silkscreen extent -30.63,-30.86 30.2,31.55
TRANSFORMER_PCB_74014_MYRRA [mm] "pitch 1.27 mm"
  oval 1.7x1 hole 0.7: 1(-6.248,6.502) 2(-6.248,3.886) 4(-6.248,-1.448) 5(-6.248,-4.089) 6(-6.299,-6.858) 7(6.172,-5.41) 8(6.198,-2.083) 9(6.223,1.473) 10(6.198,5.105)
  silkscreen extent -9.22,-9.14 8.84,9.12

## Part data
C1: library part C-RAD-2_5-6_8, "Aluminum, 470 µF 25 V  Radial, Can 10000 Hrs @ 105°C", ManufacturePartName=25ZLH470MEFC10X12.5, Part Name="Electrolytic Capacitors", ComponentLink1Description="on digikey", ComponentLink1URL=https://www.digikey.at/en/products/detail/rubycon/25ZLH470MEFC10X12-5/3563614, Price=€0.16064
C2 C4: library part CC0805, "4700 pF ±10% 250VAC, X7R 2220 (5750Metric)", Part Name="Ceramic Capacitor", ComponentLink1Description="on digikey", ComponentLink1URL=https://www.digikey.at/en/products/detail/murata-electronics/GA355DR7GF472KW01L/789281, ManufacturePartName=GA355DR7GF472KW01, Price=€0.64186
C3: library part CC0805, "1000 pF ±10% 250VAC, X7R 1808 (4520 Metric)", ManufacturePartName=SCDP302W102K4GV001E, Part Name="Ceramic Capacitor", ComponentLink1Description="on Digikey", ComponentLink1URL=https://www.digikey.at/en/products/detail/johanson-dielectrics-inc/SCDP302W102K4GV001E/1561168, Price=€0.44162
C5 C56: library part CC0805, "0.1 µF ±10% 50V, X7R 0805 (2012 Metric)", ManufacturePartName=GRM21BR71H104KA01L, ComponentLink1Description="on digikey", ComponentLink1URL=https://www.digikey.at/en/products/detail/murata-electronics/GRM21BR71H104KA01L/586718, Part Name=https://www.digikey.at/en/products/detail/bourns-inc/CR0805-FX-1500ELF/3784656, Price=$0.15
C6 C7: library part CC0805, "100 pF ±5% 50V, C0G, NP0 0805 (2012 Metric)", ManufacturePartName=GRM2165C1H101JA01D, Part Name="Ceramic Capacitor", ComponentLink1Description="on digikey", ComponentLink1URL=https://www.digikey.at/en/products/detail/murata-electronics/GRM2165C1H101JA01D/586800?s=N4IgTCBcDaIOICUCyYCMA2ArAYVQCVQAZUApAQWIBEQBdAXyA, Price=€0.02912
C8 C9 C14: library part CC0805, "4700 pF ±10% 250VAC, X7R 2220 (5750Metric)", Part Name="Ceramic Capacitor 2220", ComponentLink1Description="on digikey", ComponentLink1URL=https://www.digikey.at/en/products/detail/murata-electronics/GA355DR7GF472KW01L/789281, ManufacturePartName=GA355DR7GF472KW01
  C8 C9: Price="Name Value"
  C14: Price=€0.64186
C10 C11: library part CC0805, "1000 pF ±10% 250VAC, X7R 1808 (4520 Metric)", ManufacturePartName=GA342QR7GD102KW01L, Part Name="Ceramic Capacitor", ComponentLink1Description="on digikey", ComponentLink1URL=https://www.digikey.at/en/products/detail/murata-electronics/GA342QR7GD102KW01L/789288, Price=€0.47808
C12 C13: library part C-RAD-2_5-6_8, "120 µF 400 V Aluminum, Radial, Can 10000 Hrs @ 105°C", ManufacturePartName=EKXG401ELL121MMP1S, Part Name="Electrolytic Capacitors", ComponentLink1Description="on digikey", ComponentLink1URL=https://www.digikey.at/en/products/detail/chemi-con/EKXG401ELL121MMP1S/755986, Price=€1.48090
C15: library part C-RAD-2_5-6_8, "Aluminum Electrolytic Capacitors Radia - 15 µF 400 V l, Can 2000 Hrs @ 105°C", ManufacturePartName=400AX15MEFC10X16, Part Name="Electrolytic Capacitor", ComponentLink1Description="on digikey", ComponentLink1URL=https://www.digikey.si/en/products/detail/rubycon/400AX15MEFC10X16/3563632, Price=€0.28346
C16: library part C-RAD-2_5-6_8, "Radia - 15 µF 400 V l, Can 2000 Hrs @ 105°C", ManufacturePartName=400AX15MEFC10X16, Part Name="Electrolytic Capacitor", ComponentLink1Description="on digikey", ComponentLink1URL=https://www.digikey.si/en/products/detail/rubycon/400AX15MEFC10X16/3563632, Price=€0.28346
C17: library part C-RAD-2_5-6_8, "Aluminum , Radial - 15 µF 50 V , Can 1000 Hrs @ 105°C", ManufacturePartName=EEU-FC1H150H, Part Name="Electrolytic Capacitors", ComponentLink1Description="on digikey", ComponentLink1URL=https://www.digikey.si/en/products/detail/panasonic-electronic-components/EEU-FC1H150H/2689667, Price=€0.09332
C18: library part CC0805, "2200 pF,Capacitor 2 kV Radial, 11mm- between pins", ManufacturePartName=CDV30FJ222JO3, Part Name="Capacitors PTFE", ComponentLink1Description="on digikey", ComponentLink1URL=https://www.digikey.si/en/products/detail/cornell-dubilier-knowles/CDV30FJ222JO3/6144153, Price=€1,36
C19: library part CC0805, "0.1 µF ±10% 50V Ceramic Capacitor X7R 0805 (2012 Metric)", ManufacturePartName=GRM21BR71H104KA01, Part Name="Ceramic Capacitor", ComponentLink1Description="on digikey", ComponentLink1URL=https://www.digikey.si/en/products/detail/murata-electronics/GRM21BR71H104KA01L/586718, Price=€0.15
C20: library part C-RAD-2_5-6_8, "220 µF 35 V Aluminum, Radial, Can 8000 Hrs @ 105°C", ManufacturePartName=35ZLH220MEFCT78X11.5, ComponentLink1Description="on digikey", ComponentLink1URL=https://www.digikey.com/en/products/detail/rubycon/35ZLH220MEFCT78X11-5/3568150, Part Name="Electrolytic Capacitors", Price=$0.13368
C22 C23 C25 C26 C27: library part CC0805, "10 µF ±10% 25V Ceramic Capacitor X5R 0805 (2012 Metric)", ManufacturePartName=GRM21BR61E106KA73L, Part Name="Ceramic Capacitor", Price=€0.06464
  C22 C23 C25 C27: ComponentLink1Description="on digikey", ComponentLink1URL=https://www.digikey.si/en/products/detail/murata-electronics/GRM21BR61E106KA73L/2334874?s=N4IgTCBcDaIOICUCyYCMAhBA2VBRVADFgNICCA7AMwAyIAugL5A
C24: library part C-RAD-2_5-6_8, "470 µF 25 V Aluminum Electrolytic Capacitors Radial, Can 10000 Hrs @ 105°C (10x20mm)", ManufacturePartName=25ZLH470MEFC10X12.5, ComponentLink1Description="on Digikey", ComponentLink1URL=https://www.digikey.at/en/products/detail/rubycon/25ZLH470MEFC10X12-5/3563614, Part Name="Electrolytic Capacitors", Price=$0.17156
C28: library part CC0805, "0.1 µF ±10% 50V  X7R 0805 (2012 Metric)", ManufacturePartName=GRM21BR71H104KA01, Part Name="Ceramic Capacitor", ComponentLink1Description="on digikey", ComponentLink1URL=https://www.digikey.si/en/products/detail/murata-electronics/GRM21BR71H104KA01L/586718, Price=$0.15
C29 C30: library part CC0805, "27 pF ±5% 50V, C0G, NP0 0805 (2012 Metric)", ManufacturePartName=GRM2165C1H270JZ01D, Part Name="Ceramic Capacitor", ComponentLink1Description="on digikey", ComponentLink1URL=https://www.digikey.si/en/products/detail/murata-electronics/GRM2165C1H270JZ01D/2612651, Price=€0.02372
C31 C39: library part CC0805, "0.1 µF ±10% 50V  X7R 0805 (2012 Metric)", ManufacturePartName=GRM21BR71H104KA01, Part Name="Ceramic Capacitor 0805", ComponentLink1Description="on digikey", ComponentLink1URL=https://www.digikey.si/en/products/detail/murata-electronics/GRM21BR71H104KA01L/586718, Price=$0.15
C32 C33 C34: library part CC0805, "Ceramic Capacitor  - GRM219C71E475KE21L,  / 4.7 µF ±10% 25V X7S 0805 (2012 Metric)", ManufacturePartName=GRM219C71E475KE21L, Part Name="Ceramic Capacitor 0805", Price=$0.15
  C32: ComponentLink1Description="on digikey", ComponentLink1URL=https://www.digikey.si/en/products/detail/murata-electronics/GRM219C71E475KE21L/8323859
C35 C36 C37 C40 C41: library part CC0805, "Ceramic Capacitor- GRM21BR71H104KA01, 0.1 µF ±10% 50V  X7R 0805 (2012 Metric)", ManufacturePartName=GRM21BR71H104KA01, Part Name="Ceramic Capacitor 0805", Price=$0.15
  C35: ComponentLink1Description="on digikey", ComponentLink1URL=https://www.digikey.si/en/products/detail/murata-electronics/GRM21BR71H104KA01L/586718
C38: "GRM21BR71H105KA01", Part Name="Ceramic Capacitor 0805", ManufacturePartName=GRM21BR71H105KA01, Price=$0.15
C42: "GRM21BR71H103KA01", Part Name="Ceramic Capacitor 0805", ManufacturePartName=GRM21BR71H103KA01, Price=$0.15
C43 C46 C47 C48: library part CC0805, "10000 pF ±5% 50V Ceramic Capacitor C0G, NP0 0805 (2012 Metric)", ManufacturePartName=GRM2195C1H103JA01D, Part Name="Ceramic Capasitor 0805", ComponentLink1Description="on digikey", ComponentLink1URL=https://www.digikey.si/en/products/detail/murata-electronics/GRM2195C1H103JA01D/586788, Price=€0.05564
C44: library part C-RAD-2_5-6_8, "2000 µF 50 V Aluminum, Radial, Can 25mOhm @ 100kHz 5000 Hrs @ 105°C", ManufacturePartName=EKYC500ELL202ML30S, Part Name="Electrolytic Capacitors", ComponentLink1Description="on digikey", ComponentLink1URL=https://www.digikey.si/en/products/detail/chemi-con/EKYC500ELL202ML30S/10486414, Price=$1.15544
C45: library part CC0805, "0.1 µF ±10% 100V, r X7R 0805 (2012 Metric)", ManufacturePartName=CL21B104KCFNNNE, Part Name="Cermic Capasitor 0805", ComponentLink1Description="on digikey", ComponentLink1URL=https://www.digikey.at/en/products/detail/samsung-electro-mechanics/CL21B104KCFNNNE/5961324, Price=€0.01500
C49: library part C-RAD-2_5-6_8, "220 µF 35 V, Aluminum,Radial, Can 8000 Hrs @ 105°C", ManufacturePartName=35ZLH220MEFCT78X11.5, ComponentLink1Description="on digiKey", ComponentLink1URL=https://www.digikey.si/en/products/detail/rubycon/35ZLH220MEFCT78X11-5/3568150, Part Name="Electrolytic Capacitors", Price="€0.12516 (500 Quantity)"
C50: library part CC0805, "0805, 0.01uF, 50V, X7R, -55°C ~ 125°C.", ManufacturePartName=0805B103K251DC, Part Name="Ceramic Capacitor 0805", ComponentLink2Description="on DigiKey", ComponentLink2URL=https://www.digikey.si/en/products/detail/nextgen-components/0805B103K251DC/18668378, Price=€0.03371
C51: library part CC0805, "0805, 0.01uF, 50V, X7R,  (470 пік ... 10 мкФ) 50кГц", ManufacturePartName=CC0805KRX7R9BB103, Part Name="Ceramic Capacitor 0805", ComponentLink1Description="on digikey", ComponentLink1URL=https://www.digikey.si/en/products/detail/yageo/CC0805KRX7R9BB103/302870?s=N4IgTCBcDaIMJwAwA5EFYDSAlAGgdiwE4AhYgRkQGYQBdAXyA, Price="€0.01820 (500 Quantity)"
C52: library part CC0805, "2.2 µF ±10% 16V, X7R 0805 (2012 Metric)", ManufacturePartName=C2012X7R1C225K125AB, ComponentLink1Description="on digikey", ComponentLink1URL=https://www.digikey.si/en/products/detail/tdk-corporation/C2012X7R1C225K125AB/569046, Part Name="Ceramic Capacitor  0805", Price="€0.04512 (500 Quantity)"
C53: library part CC0805, "0805, 1n, 5%, 50V, -55..+125, Murata (470 пік ... 10 мкФ) 50кГц", ManufacturePartName=GRM2165C1H102JA01D, Part Name="Ceramic Capacitor 0805", ComponentLink1Description="on digikey", ComponentLink1URL=https://www.digikey.si/en/products/detail/murata-electronics/GRM2165C1H102JA01D/586809?s=N4IgTCBcDaIOICUCyYCMA2ArAYVQCVQAYwApAQUNQBEQBdAXyA, Price=€0.04148
C54: library part CC0805, "Capacitor GRM2165C1H102JA01D, 0805, 1n, 5%, 50V, -55..+125, Murata (470 пік ... 10 мкФ) 50кГц", ManufacturePartName=GRM2165C1H102JA01D, Part Name="Ceramic Capacitor 0805", ComponentLink1Description="on digikey", ComponentLink1URL=https://www.digikey.si/en/products/detail/murata-electronics/GRM2165C1H102JA01D/586809?s=N4IgTCBcDaIOICUCyYCMA2ArAYVQCVQAYwApAQUNQBEQBdAXyA, Price=€0.04148
C55: "0805, 0.1 µF ±10% 100V, r X7R(2012 Metric)", ManufacturePartName=CL21B104KCFNNNE, Part Name="Ceramic Capasitor", Price=€0.01500
D1: library part IRS2186S, "Driver FET-IGBT IRS2186S SOP-8, 600V; Iout+: 4 А; Iout-: 4 А", ManufacturePartName=IRS2186STRPBF, Part Name="Driver Transistors", ComponentLink1Description="on digikey", ComponentLink1URL=https://www.digikey.at/en/products/detail/infineon-technologies/IRS2186STRPBF/1300640, Price=€1.18458
D2: library part MC34074D, "1 Circuit,  Rail-to-Rail, 1.3 MHz, SOT23-5", ManufacturePartName=LMV321ILT, Part Name=Amplifier, ComponentLink1Description="on digikey", ComponentLink1URL=https://www.digikey.at/en/products/detail/stmicroelectronics/LMV321ILT/1003361?s=N4IgTCBcDaIDIFkBqBmMBGAlgGwC4gF0BfIA, Price=€0.41382
D3: library part VIPER16LN, "PWM controller - VIPER16L, DIP7, 800 V power section", ManufacturePartName=Viper16ln, Part Name="PWM controller", ComponentLink1Description=prom, ComponentLink1URL=https://prom.ua/ua/p568620386-mikroshema-viper16l-dip7.html, Price="83.20 ? prom"
D4 D8: library part PC_123PJ, "Output 1 Channel 4-SMD, 5KV", ManufacturePartName=PC817X3NIP1B, Part Name="Optoisolator Transistor", ComponentLink1URL=https://www.digikey.si/en/products/detail/sharp-socle-technology/PC817X3NIP1B/6188255?s=N4IgTCBcDaIAoGEAcBGA7ADQMwDkCScKAQiALoC%2BQA, Price="eur 0.205 (500 Quantity)"
  D4: ComponentLink1Description="on Digikey"
  D8: ComponentLink1Description="on digikey"
D5: library part LM1117, "800-mA, 3.3V, Low-Dropout SOT-223", ManufacturePartName=LM1117-3.3, Part Name="Linear Voltage Regulator", ComponentLink1Description="on digikey", ComponentLink1URL=https://www.digikey.si/en/products/detail/texas-instruments/LM1117IMPX-3-3-NOPB/1870906, Price=€0.61270
D6: library part LM1117, "3.3V, 100-mA, SOT-89", ManufacturePartName=L78L33CD-TR, Part Name="Linear Voltage Regulator", ComponentLink1Description="on digikey", ComponentLink1URL=https://www.digikey.si/en/products/detail/stmicroelectronics/L78L33CD-TR/1038307, Price=€0.18134
D7: library part STM32F030C8T6, "ARM Cortex-M0, 32-bit MCU, 64 KB Flash, 8 KB Internal RAM, 39 I/Os, 48-pin LQFP, -40 to 85 degC, Tray", Part Name=Microcontroller, ComponentLink1Description="Manufacturer URL", ComponentLink1URL=http://www.st.com/web/en/home.html, ComponentLink2Description=Datasheet, ComponentLink2URL=http://www.st.com/st-web-ui/static/active/en/resource/technical/document/datasheet/DM00088500.pdf, ComponentLink3Description="Package Specification", ComponentLink3URL=http://www.st.com/st-web-ui/static/active/en/resource/technical/document/datasheet/DM00058181.pdf, ComponentLink4Description="on digikey", ComponentLink4URL=https://www.digikey.si/en/products/detail/stmicroelectronics/STM32F030C8T6/4357252, ManufacturePartName=STM32F030C8T6, Price=$1.62450
D9: library part TL494BD, "Buck, Push-Pull Regulator Positive Output Step-Down, Step-Up/Step-Down DC-DC Controller IC 16-SOIC", ManufacturePartName=TL494BDR2, Part Name="PWM COntroller - TL494BDR2-ND - Tape & Reel", ComponentLink1Description="on digikey", ComponentLink1URL=https://www.digikey.si/en/products/detail/onsemi/TL494BD/1485361, Price=€0.49052
D10: library part ST485D, "Transceivers sn65hvd10dr,  / 1/1 Transceiver Half RS422, RS485 8-SOIC8", ManufacturePartName=SN65HVD10DR, Part Name="Interface Driver", ComponentLink1Description="on digikey", ComponentLink1URL=https://www.digikey.si/en/products/detail/texas-instruments/SN65HVD10DR/1574463, Price=€2.17836
D11: library part MC34074D, "4 Circuit Rail-to-Rail 14-SOIC", ManufacturePartName=LMV324, Part Name="Linear Amplifier", ComponentLink1Description="on digikey", ComponentLink1URL=https://www.digikey.si/en/products/detail/texas-instruments/LMV324AIDR/9674909, Price=€0.12294
FU1: "250В AC, 16A (5x20мм)", ManufacturePartName=UDA16A250V, Part Name=Fuse, ComponentLink1Description=fuseClips_№3519_datasheet, ComponentLink1URL=https://www.keyelco.com/userAssets/file/M65p46.pdf, ComponentLink2Description="on Digikey clips", ComponentLink2URL=https://www.digikey.at/en/products/detail/keystone-electronics/3519/316012, ComponentLink3Description="on Digikey fuse", ComponentLink3URL=https://www.digikey.at/en/products/detail/schurter-inc/0034-3122/639682, Price=$0.202
K1 K2 K3: library part Relay_1P, "General Purpose Relay SPST-NO (1 Form A) 5VDC Coil Through Hole", ManufacturePartName=ALE15B05, Part Name=Relay, Price="87 Грн"
  K1: ComponentLink1Description="on Digikey", ComponentLink1URL=https://www.digikey.be/en/products/detail/panasonic-electric-works/ALE15B05/645484
L1: library part PMCE-0160, "1 mH @ 1 kHz 2 Line Common Mode Choke Through Hole 10A DCR 10mOhm, (30.48mm x 15.24mm)", Part Name="Line Common Mode Choke Through Hole", ComponentLink1Description="on Digikey", ComponentLink1URL=https://www.digikey.at/en/products/detail/bourns-inc/8108-RC/775442?s=N4IgTCBcDaIBwEYAMcC0AlAwiAugXyA, ManufacturePartName=8108-RC, Price=€3.25250
L2: "RANLO TR06 DR1020 / 50A 0.5uH Power Choke Inductor Bar Size 10*20mm", ManufacturePartName="RANLO TR06 DR1020"
R1: library part R0805_IPC, "0805, 510 Ohm, 1%", ManufacturePartName=CR0805-FX-1502ELF, ComponentLink1Description="on Digikey", ComponentLink1URL=https://www.digikey.at/en/products/detail/bourns-inc/CR0805-FX-1502ELF/3740950, Part Name="Resistor 0805", Price=€0.00696
R2 R3 R5 R6: library part R2512, "5.1 Ohms ±5% 0.25W, 1/4W Chip Resistor 1206 (3216 Metric) Moisture Resistant Thick Film", ManufacturePartName=CR1206-J/-5R1ELF, ComponentLink1URL=https://www.digikey.at/en/products/detail/bourns-inc/CR1206-J-5R1ELF/3785502, Part Name="Resistor 1206", Price=$0.01514
  R2 R3 R5: ComponentLink1Description="on Digikey"
  R6: ComponentLink1Description="on  Digikey"
R4 R7: library part R0805_IPC, "0805, 150 Ohm, 1%", ManufacturePartName=CR0805-FX-1500ELF, ComponentLink1Description="on Digikey", ComponentLink1URL=https://www.digikey.at/en/products/detail/bourns-inc/CR0805-FX-1500ELF/3784656, Part Name="Resistor 0805", Price=€0.00696
R8 R9: library part R2512, "1206, 10 kOhm, 5%", ManufacturePartName=CR1206-JW-103ELF, ComponentLink1Description="on Digikey", ComponentLink1URL=https://www.digikey.at/en/products/detail/bourns-inc/CR1206-JW-103ELF/3741050, Part Name="Resistor 1206", Price=$0.00984
R10 R12: "0.01 om, 1 w, ± 1%  / 1500 ppm/K", ManufacturePartName=RL2512FK-070R01L, Part Name="Resistor 2512", ComponentLink1Description="on Digikey", ComponentLink1URL=https://www.digikey.at/en/products/detail/yageo/RL2512FK-070R01L/1037140?s=N4IgTCBcDaIEoBkwFYCMYBiBpAtABgHY849UEQBdAXyA, Price=€0.18592
R11 R84 R85 R86 R87: library part R2512, "270 Om, 2512, 1W, 5%", ManufacturePartName=CR2512-JW-271ELF, ComponentLink1Description="on Digikey", ComponentLink1URL=https://www.digikey.at/en/products/detail/bourns-inc/CR2512-JW-271ELF/4698160?s=N4IgjCBcoEwAwA4CsVQGMoDMCGAbAzgKYA0IA9lANogwDscABAPIAWAtviALqkAOALlBABVAHYBLfk0wBZQtnwBXAE6EQAX1IBaACyoQGSDgIlyVEAGYkYCxe7qHQA, Part Name="Resistor 2512", Price=$0.04402
R13: library part R2512, "1 MOhms ±1% 2W Chip, 2512 (6432 Metric) Current Sense Thick Film", ManufacturePartName=CRM2512-FX-1004ELF, ComponentLink1Description="on Digikey", ComponentLink1URL=https://www.digikey.at/en/products/detail/bourns-inc/CRM2512-FX-1004ELF/4698365, Part Name="Resistor 2512", Price=€0.16768
R14: library part R2512, "Inrush Current Limiter 1 Ohms ±20% 9 A 0.591\" (15.00mm)(15.00mm, 7.5mm)", ManufacturePartName=B57237S0109M000, Part Name="Inrush Current Limiter", ComponentLink1Description="on digikey", ComponentLink1URL=https://www.digikey.at/en/products/detail/epcos-tdk-electronics/B57237S0109M000/739854, Price=€0.50666
R15 R16 R17 R18: library part R1206_IPC, "thick film; SMD; 1206; 1M?; 0.25W; ±1%; -55?125°C", ManufacturePartName=1206S4F1004T5E, ComponentLink1Description="on TME", ComponentLink1URL=https://www.tme.eu/en/details/smd1206-1m-1%25/smd-resistors/royal-ohm/1206s4f1004t5e/, Part Name="Resistor 1206", Price=€0.02015
R19 R20 R21: library part R1206_IPC, "1206, 33.2 kOhm, 1%", ManufacturePartName=1206W4F3322T5E, ComponentLink1Description="on TME", ComponentLink1URL=https://www.tme.eu/en/details/1206w4f3322t5e/smd-resistors/royal-ohm/, Part Name="Resistor 1206", Price="usd 0.00353"
R22: library part R1206_IPC, "33.2 kOhm, 1%", ManufacturePartName=1206W4F3322T5E, Part Name="Resistor 1206", ComponentLink1Description="on TME", ComponentLink1URL=https://www.tme.eu/en/details/1206w4f3322t5e/smd-resistors/royal-ohm/, Price="usd 0.00353"
R23: library part R1206_IPC, "Resistor 0805, 240 Ohm, 5%0805S8F2400T5E", ManufacturePartName=0805S8F2400T5E, ComponentLink1Description="on TME", ComponentLink1URL=https://www.tme.eu/ua/ru/details/smd0805-1k-1%25/rezistory-smd/royal-ohm/0805s8f1001t5e/, Part Name="Resistor 0805", Price="usd 0.00482"
R24: library part R1206_IPC, "Resistor 0805, 1k Ohm, 1%0805S8F1001T5E", ManufacturePartName=0805S8F1001T5E, ComponentLink1Description="on TME", ComponentLink1URL=https://www.tme.eu/ua/ru/details/smd0805-1k-1%25/rezistory-smd/royal-ohm/0805s8f1001t5e/, Part Name="Resistor 0805", Price="usd 0.00454"
R25: library part R0805_IPC, "0805, 15 kOhm,", ManufacturePartName=0805S8J0153T5E, Part Name="Resistor 0805", ComponentLink1Description="on TME", ComponentLink1URL=https://www.tme.eu/en/details/smd0805-15k/smd-resistors/royal-ohm/0805s8j0153t5e/, Price=$0.00397
R26 R27 R28 R29 R30 R31: library part R0805MY, "0805, 510 Ohm, 5%", ManufacturePartName=0805S8J0511T5E, ComponentLink1Description="on TME", ComponentLink1URL=https://www.tme.eu/en/details/smd0805-510r/smd-resistors/royal-ohm/0805s8j0511t5e/, Part Name="Resistor 0805", Price=$0.00433
R32: library part R0805MY, "Resistor 0805, 10 kOm, 5%", ManufacturePartName=0805S8J0103T5E, ComponentLink1Description="on TME", ComponentLink1URL=https://www.tme.eu/ua/ru/details/0805s8j0103t5e/rezistory-smd/royal-ohm/, Part Name="Resistor 0805", Price=$0.00132
R33 R34 R35 R36 R37 R41: library part RC0805, "0805, 510 Ohm, 5%", ManufacturePartName=0805S8J0511T5E, ComponentLink1Description="on TME", ComponentLink1URL=https://www.tme.eu/en/details/smd0805-510r/smd-resistors/royal-ohm/0805s8j0511t5e/, Part Name="Resistor 0805", Price=$0.00433
R38 R39 R42: library part RC0805, "Resistor 0805, 510 Ohm, 5% 0805S8J0511T5E", ManufacturePartName=0805S8J0511T5E, ComponentLink1Description="on TME", ComponentLink1URL=https://www.tme.eu/en/details/smd0805-510r/smd-resistors/royal-ohm/0805s8j0511t5e/, Part Name="Resistor 0805", Price=$0.00433
R44: library part R0805_IPC, "0805, 27 kOhm, 1%", ManufacturePartName=0805S8F2702T5E, ComponentLink1Description="on TME", ComponentLink1URL=https://www.tme.eu/en/details/smd0805-27k-1%25/smd-resistors/royal-ohm/0805s8f2702t5e/, Part Name="Resistor 0805", Price="€ 0.00242"
R45: library part R0805_IPC, "0805, 2 kOhm, 1%", ManufacturePartName=0805S8F2001T5E, ComponentLink1Description="on TME", ComponentLink1URL=https://www.tme.eu/en/details/smd0805-2k-1%25/smd-resistors/royal-ohm/0805s8f2001t5e/, Part Name="Resistor 0805", Price="€ 0.00242"